# Altium PCB ledcube_v2.PcbDoc (part 5 of 18)
Units mil, origin at the board's own origin, x right, y up, seen from the top; angles counter-clockwise.
Board outline 3130 x 3300 mil, 2 copper layers (Top Layer, Bottom Layer); 188 components, 216 nets, 29515 pads, 250 vias.
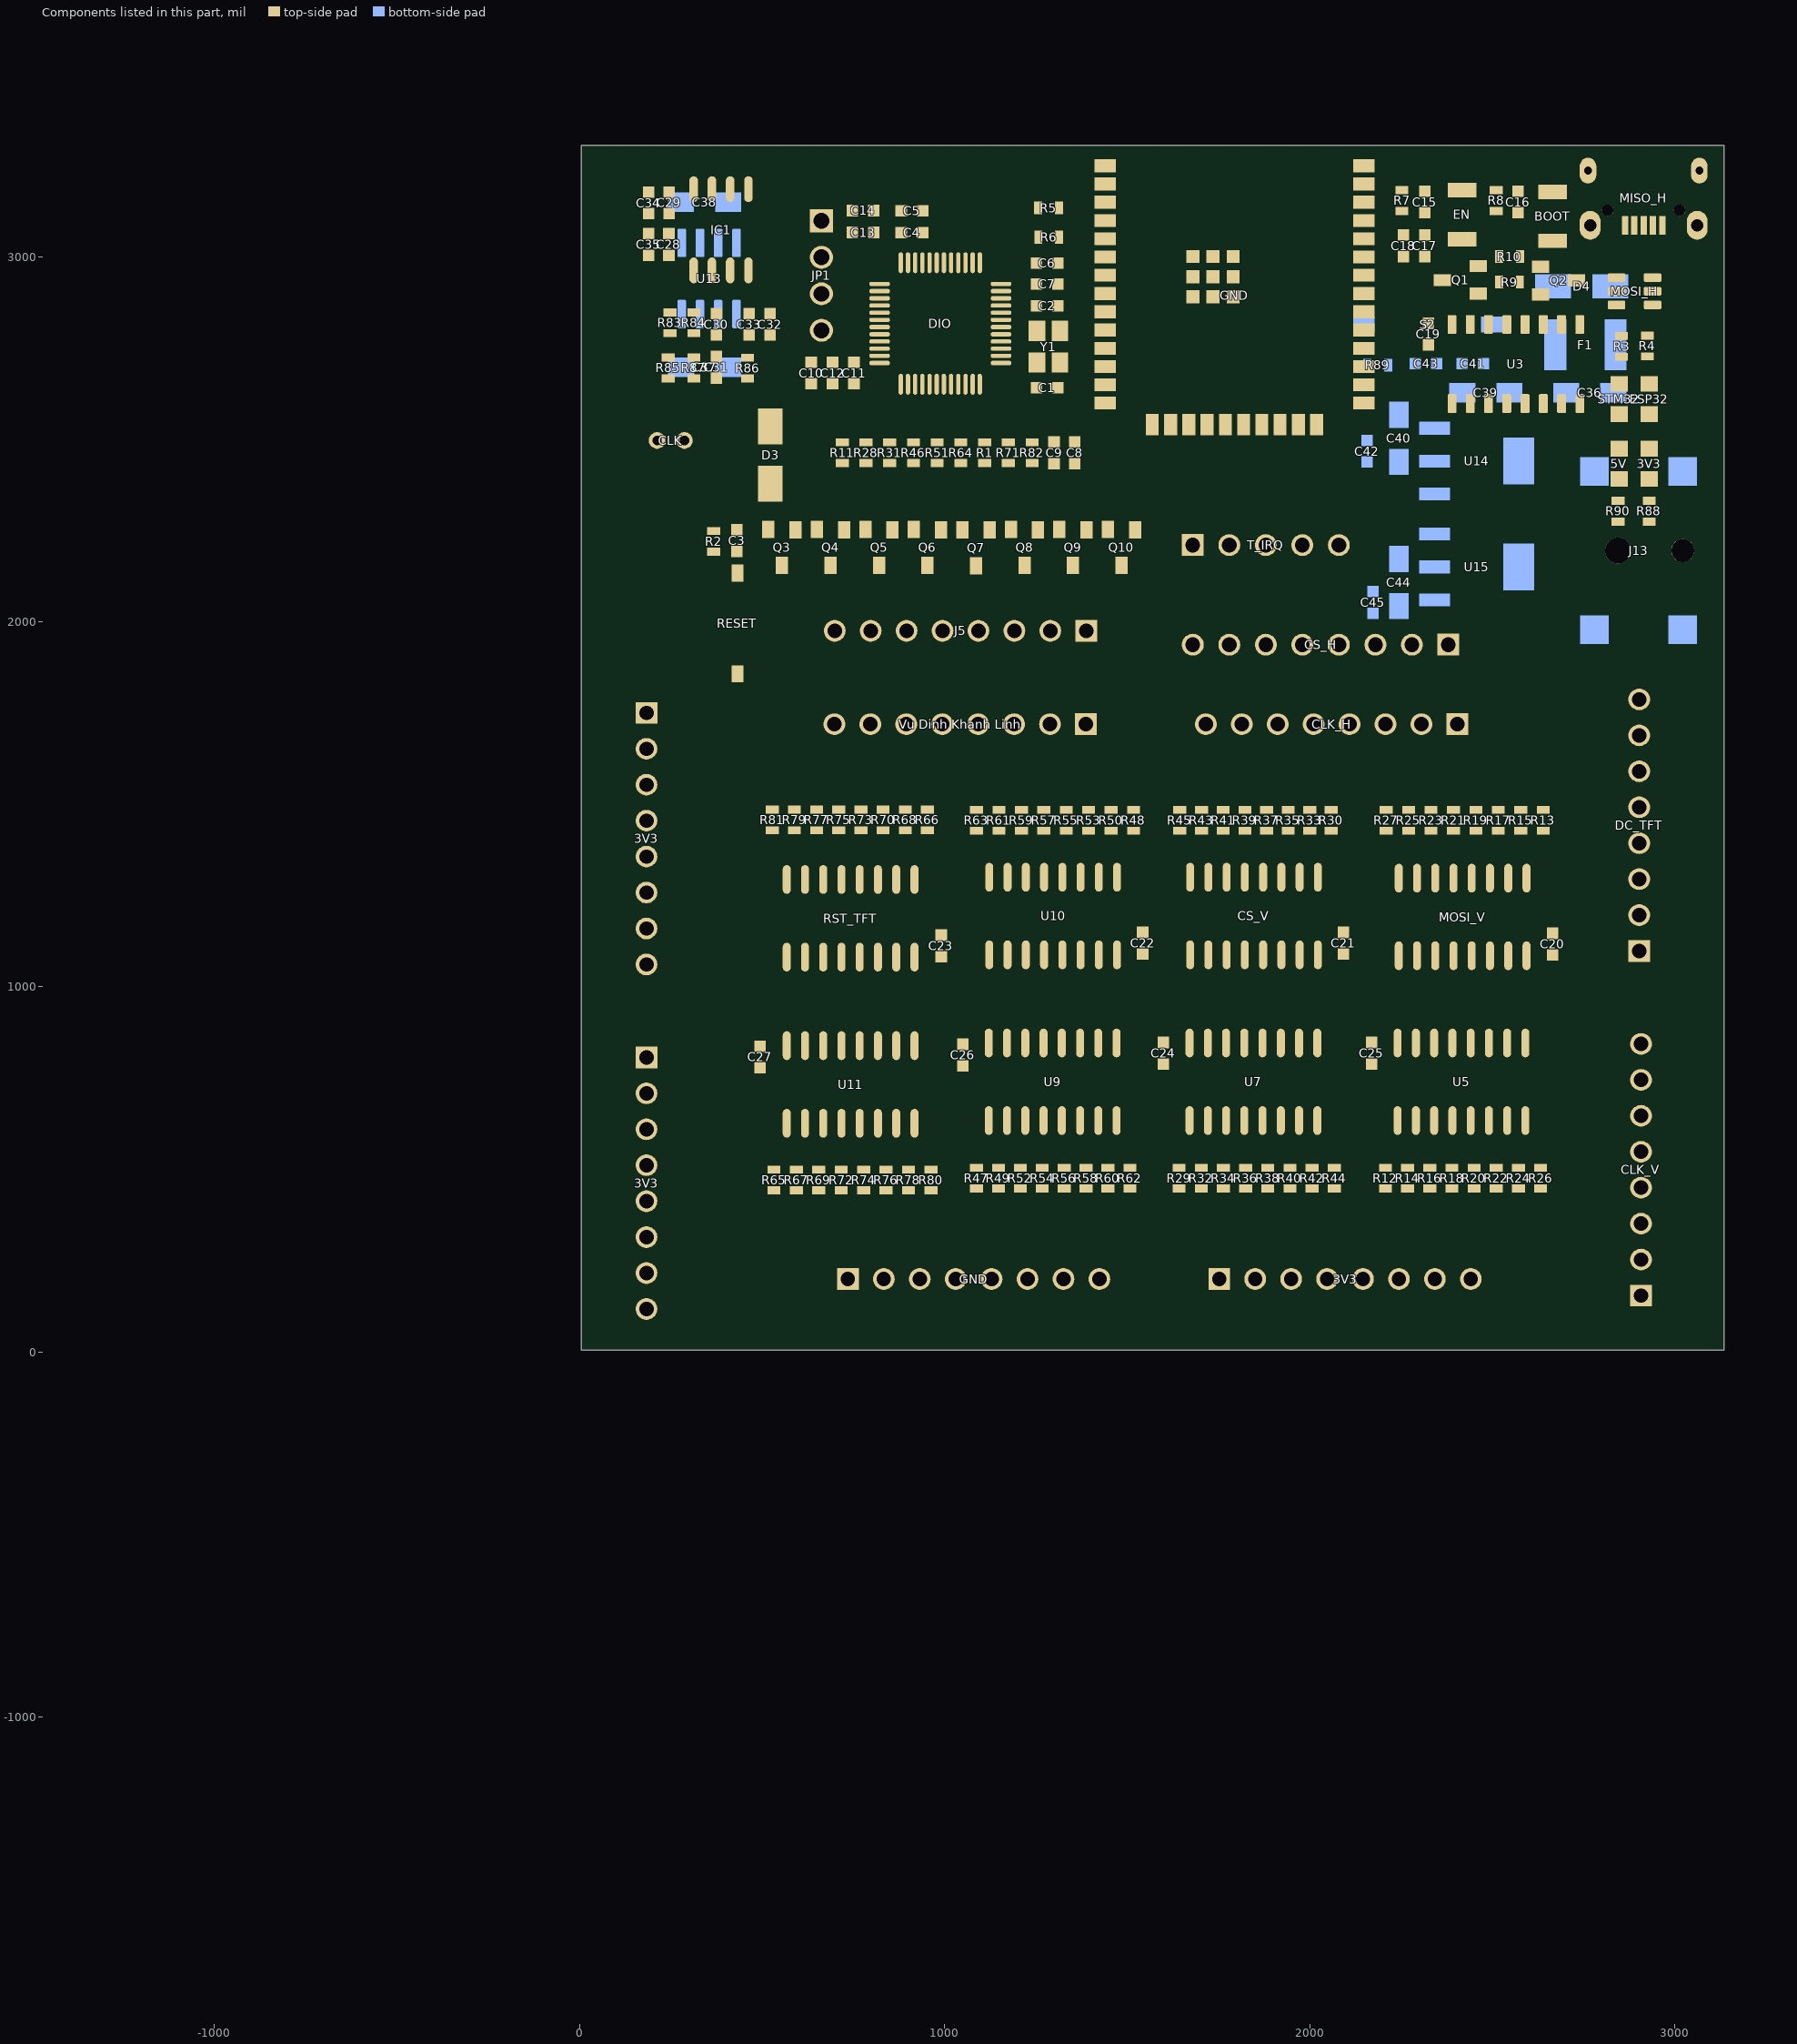
[diagram p4: the components of this part, seen from the top]

## Free pads (board coordinates) (continued)
  round 0 on Mech6: 1(-1373.58,-1738.24) 1(-1373.58,-1738.24) 1(-1373.58,-1737.36) 1(-1373.58,-1737.36) 1(-1373.58,-1737.3) 1(-1373.58,-1737.3) 1(-1373.58,-1736.41) 1(-1373.58,-1736.41) 1(-1373.53,-1735.77) 1(-1373.49,-1735.8) 1(-1373.45,-1735.26) 1(-1373.45,-1735.26) 1(-1373.45,-1735.2) 1(-1373.45,-1735.2) 1(-1373.45,-1735.14) 1(-1373.45,-1735.14) 1(-1373.45,-1735.08) 1(-1373.45,-1735.08) 1(-1373.44,-1737.33) 1(-1373.44,-1736.39) 1(-1373.42,-1735.26) 1(-1373.42,-1735.26) 1(-1373.42,-1735.2) 1(-1373.42,-1735.2) 1(-1373.42,-1735.14) 1(-1373.42,-1735.14) 1(-1373.42,-1735.08) 1(-1373.42,-1735.08) 1(-1373.4,-1735.6) 1(-1373.4,-1735.6) 1(-1373.4,-1735.53) 1(-1373.4,-1735.53) 1(-1373.4,-1735.26) 1(-1373.4,-1735.26) 1(-1373.4,-1735.2) 1(-1373.4,-1735.2) 1(-1373.39,-1735.14) 1(-1373.39,-1735.14) 1(-1373.39,-1735.08) 1(-1373.39,-1735.08) 1(-1373.39,-1735.47) 1(-1373.39,-1735.47) 1(-1373.39,-1735.41) 1(-1373.39,-1735.41) 1(-1373.37,-1735.4) 1(-1373.37,-1735.4) 1(-1373.37,-1735.24) 1(-1373.37,-1735.24) 1(-1373.36,-1735.26) 1(-1373.36,-1735.26) 1(-1373.36,-1735.2) 1(-1373.36,-1735.2) 1(-1373.36,-1735.6) 1(-1373.36,-1735.6) 1(-1373.36,-1735.53) 1(-1373.36,-1735.53) 1(-1373.36,-1735.14) 1(-1373.36,-1735.14) 1(-1373.36,-1735.08) 1(-1373.36,-1735.08) 1(-1373.36,-1735.47) 1(-1373.36,-1735.47) 1(-1373.36,-1735.41) 1(-1373.36,-1735.41) 1(-1373.35,-1738.24) 1(-1373.35,-1738.24) 1(-1373.35,-1737.36) 1(-1373.35,-1737.36) 1(-1373.35,-1737.3) 1(-1373.35,-1737.3) 1(-1373.35,-1736.41) 1(-1373.35,-1736.41) 1(-1373.33,-1735.6) 1(-1373.33,-1735.6) 1(-1373.33,-1735.53) 1(-1373.33,-1735.53) 1(-1373.33,-1735.47) 1(-1373.33,-1735.47) 1(-1373.33,-1735.41) 1(-1373.33,-1735.41) 1(-1373.3,-1735.25) 1(-1373.3,-1735.21) 1(-1373.29,-1735.6) 1(-1373.29,-1735.6) 1(-1373.29,-1735.53) 1(-1373.29,-1735.53) 1(-1373.29,-1735.47) 1(-1373.29,-1735.47) 1(-1373.29,-1735.41) 1(-1373.29,-1735.41) 1(-1373.28,-1736.07) 1(-1373.28,-1736.07) 1(-1373.28,-1736.01) 1(-1373.28,-1736.01) 1(-1373.27,-1735.59) 1(-1373.27,-1735.59) 1(-1373.27,-1735.53) 1(-1373.27,-1735.53) 1(-1373.27,-1735.48) 1(-1373.27,-1735.48) 1(-1373.27,-1735.41) 1(-1373.27,-1735.41) 1(-1373.26,-1735.8) 1(-1373.24,-1736.07) 1(-1373.24,-1736.07) 1(-1373.24,-1736.01) 1(-1373.24,-1736.01) 1(-1373.23,-1735.59) 1(-1373.23,-1735.59) 1(-1373.23,-1735.53) 1(-1373.23,-1735.53) 1(-1373.23,-1735.48) 1(-1373.23,-1735.48) 1(-1373.23,-1735.41) 1(-1373.23,-1735.41) 1(-1373.22,-1735.77) 1(-1373.21,-1736.07) 1(-1373.21,-1736.07) 1(-1373.21,-1736.01) 1(-1373.21,-1736.01) 1(-1373.18,-1735.6) 1(-1373.18,-1735.6) 1(-1373.18,-1735.53) 1(-1373.18,-1735.53) 1(-1373.18,-1736.07) 1(-1373.18,-1736.07) 1(-1373.18,-1736.01) 1(-1373.18,-1736.01) 1(-1373.18,-1735.48) 1(-1373.18,-1735.48) 1(-1373.18,-1735.41) 1(-1373.18,-1735.41) 1(-1373.17,-1735.49) 1(-1373.17,-1735.4) 1(-1373.17,-1735.4) 1(-1373.17,-1735.24) 1(-1373.17,-1735.24) 1(-1373.15,-1735.6) 1(-1373.15,-1735.6) 1(-1373.15,-1735.53) 1(-1373.15,-1735.53) 1(-1373.15,-1737.48) 1(-1373.15,-1737.48) 1(-1373.15,-1737.42) 1(-1373.15,-1737.42) 1(-1373.14,-1735.48) 1(-1373.14,-1735.48) 1(-1373.14,-1735.41) 1(-1373.14,-1735.41) 1(-1373.12,-1735.48) 1(-1373.12,-1735.48) 1(-1373.12,-1735.41) 1(-1373.12,-1735.41) 1(-1373.11,-1736.83) 1(-1373.11,-1736.83) 1(-1373.11,-1736.77) 1(-1373.11,-1736.77) 1(-1373.11,-1737.48) 1(-1373.11,-1737.48) 1(-1373.11,-1737.42) 1(-1373.11,-1737.42) 1(-1373.11,-1737.82) 1(-1373.11,-1737.82) 1(-1373.11,-1737.76) 1(-1373.11,-1737.76) 1(-1373.09,-1735.48) 1(-1373.09,-1735.48) 1(-1373.09,-1735.41) 1(-1373.09,-1735.41) 1(-1373.08,-1736.83) 1(-1373.08,-1736.83) 1(-1373.08,-1736.77) 1(-1373.08,-1736.77) 1(-1373.08,-1737.6) 1(-1373.08,-1737.6) 1(-1373.08,-1737.45) 1(-1373.08,-1737.45) 1(-1373.08,-1737.15) 1(-1373.08,-1737.15) 1(-1373.08,-1737) 1(-1373.08,-1737) 1(-1373.07,-1737.82) 1(-1373.07,-1737.82) 1(-1373.07,-1737.76) 1(-1373.07,-1737.76) 1(-1373.05,-1736.83) 1(-1373.05,-1736.83) 1(-1373.05,-1736.77) 1(-1373.05,-1736.77) 1(-1373.05,-1737.82) 1(-1373.05,-1737.82) 1(-1373.05,-1737.76) 1(-1373.05,-1737.76) 1(-1373.04,-1737.59) 1(-1373.04,-1737.55) 1(-1373.02,-1736.63) 1(-1373.02,-1736.63) 1(-1373.02,-1736.41) 1(-1373.02,-1736.41) 1(-1373.02,-1736.38) 1(-1373.02,-1736.38) 1(-1373.02,-1736.15) 1(-1373.02,-1736.15) 1(-1373.02,-1736.83) 1(-1373.02,-1736.83) 1(-1373.02,-1736.77) 1(-1373.02,-1736.77) 1(-1373.01,-1738.06) 1(-1373.01,-1737.82) 1(-1373.01,-1737.82) 1(-1373.01,-1737.76) 1(-1373.01,-1737.76) 1(-1373.01,-1735.61) 1(-1373.01,-1735.61) 1(-1373.01,-1735.55) 1(-1373.01,-1735.55) 1(-1372.99,-1736.83) 1(-1372.99,-1736.83) 1(-1372.99,-1736.77) 1(-1372.99,-1736.77) 1(-1372.99,-1737.82) 1(-1372.99,-1737.82) 1(-1372.99,-1737.76) 1(-1372.99,-1737.76) 1(-1372.99,-1738.19) 1(-1372.99,-1738.19) 1(-1372.99,-1737.97) 1(-1372.99,-1737.97) 1(-1372.97,-1735.61) 1(-1372.97,-1735.61) 1(-1372.97,-1735.55) 1(-1372.97,-1735.55) 1(-1372.96,-1736.83) 1(-1372.96,-1736.83) 1(-1372.96,-1736.77) 1(-1372.96,-1736.77) 1(-1372.95,-1737.82) 1(-1372.95,-1737.82) 1(-1372.95,-1737.76) 1(-1372.95,-1737.76) 1(-1372.95,-1735.61) 1(-1372.95,-1735.61) 1(-1372.95,-1735.55) 1(-1372.95,-1735.55) 1(-1372.93,-1736.83) 1(-1372.93,-1736.83) 1(-1372.93,-1736.77) 1(-1372.93,-1736.77) 1(-1372.93,-1737.82) 1(-1372.93,-1737.82) 1(-1372.93,-1737.76) 1(-1372.93,-1737.76) 1(-1372.92,-1735.83) 1(-1372.92,-1735.83) 1(-1372.92,-1735.77) 1(-1372.92,-1735.77) 1(-1372.92,-1735.61) 1(-1372.92,-1735.61) 1(-1372.92,-1735.55) 1(-1372.92,-1735.55) 1(-1372.9,-1736.83) 1(-1372.9,-1736.83) 1(-1372.9,-1736.77) 1(-1372.9,-1736.77) 1(-1372.89,-1737.82) 1(-1372.89,-1737.82) 1(-1372.89,-1737.76) 1(-1372.89,-1737.76) 1(-1372.89,-1735.61) 1(-1372.89,-1735.61) 1(-1372.89,-1735.55) 1(-1372.89,-1735.55) 1(-1372.89,-1735.83) 1(-1372.89,-1735.83) 1(-1372.89,-1735.77) 1(-1372.89,-1735.77) 1(-1372.88,-1735.21) 1(-1372.88,-1735.21) 1(-1372.88,-1735.18) 1(-1372.88,-1735.18) 1(-1372.88,-1735.15) 1(-1372.88,-1735.15) 1(-1372.88,-1735.12) 1(-1372.88,-1735.12) 1(-1372.87,-1736.83) 1(-1372.87,-1736.83) 1(-1372.87,-1736.77) 1(-1372.87,-1736.77) 1(-1372.86,-1737.82) 1(-1372.86,-1737.82) 1(-1372.86,-1737.76) 1(-1372.86,-1737.76) 1(-1372.86,-1735.83) 1(-1372.86,-1735.83) 1(-1372.86,-1735.77) 1(-1372.86,-1735.77) 1(-1372.86,-1735.61) 1(-1372.86,-1735.61) 1(-1372.86,-1735.55) 1(-1372.86,-1735.55) 1(-1372.84,-1736.83) 1(-1372.84,-1736.83) 1(-1372.84,-1736.77) 1(-1372.84,-1736.77) 1(-1372.83,-1737.82) 1(-1372.83,-1737.82) 1(-1372.83,-1737.76) 1(-1372.83,-1737.76) 1(-1372.82,-1735.83) 1(-1372.82,-1735.83) 1(-1372.82,-1735.77) 1(-1372.82,-1735.77) 1(-1372.82,-1735.21) 1(-1372.82,-1735.21) 1(-1372.82,-1735.18) 1(-1372.82,-1735.18) 1(-1372.82,-1735.15) 1(-1372.82,-1735.15) 1(-1372.82,-1735.12) 1(-1372.82,-1735.12) 1(-1372.81,-1736.83) 1(-1372.81,-1736.83) 1(-1372.81,-1736.77) 1(-1372.81,-1736.77) 1(-1372.8,-1737.82) 1(-1372.8,-1737.82) 1(-1372.8,-1737.76) 1(-1372.8,-1737.76) 1(-1372.79,-1735.83) 1(-1372.79,-1735.83) 1(-1372.79,-1735.77) 1(-1372.79,-1735.77) 1(-1372.78,-1736.83) 1(-1372.78,-1736.83) 1(-1372.78,-1736.77) 1(-1372.78,-1736.77) 1(-1372.77,-1735.58) 1(-1372.77,-1735.58) 1(-1372.77,-1735.31) 1(-1372.77,-1735.31) 1(-1372.77,-1737.82) 1(-1372.77,-1737.82) 1(-1372.77,-1737.76) 1(-1372.77,-1737.76) 1(-1372.76,-1735.83) 1(-1372.76,-1735.83) 1(-1372.76,-1735.77) 1(-1372.76,-1735.77) 1(-1372.75,-1736.83) 1(-1372.75,-1736.83) 1(-1372.75,-1736.77) 1(-1372.75,-1736.77) 1(-1372.75,-1735.21) 1(-1372.75,-1735.21) 1(-1372.75,-1735.18) 1(-1372.75,-1735.18) 1(-1372.75,-1735.15) 1(-1372.75,-1735.15) 1(-1372.75,-1735.12) 1(-1372.75,-1735.12) 1(-1372.74,-1737.82) 1(-1372.74,-1737.82) 1(-1372.74,-1737.76) 1(-1372.74,-1737.76) 1(-1372.73,-1735.83) 1(-1372.73,-1735.83) 1(-1372.73,-1735.77) 1(-1372.73,-1735.77) 1(-1372.72,-1737.05) 1(-1372.72,-1737.01) 1(-1372.72,-1736.83) 1(-1372.72,-1736.83) 1(-1372.72,-1736.77) 1(-1372.72,-1736.77) 1(-1372.71,-1737.82) 1(-1372.71,-1737.82) 1(-1372.71,-1737.76) 1(-1372.71,-1737.76) 1(-1372.69,-1735.83) 1(-1372.69,-1735.83) 1(-1372.69,-1735.77) 1(-1372.69,-1735.77) 1(-1372.69,-1736.83) 1(-1372.69,-1736.83) 1(-1372.69,-1736.77) 1(-1372.69,-1736.77) 1(-1372.69,-1737.6) 1(-1372.69,-1737.6) 1(-1372.69,-1737.45) 1(-1372.69,-1737.45) 1(-1372.69,-1737.15) 1(-1372.69,-1737.15) 1(-1372.69,-1737) 1(-1372.69,-1737) 1(-1372.68,-1735.21) 1(-1372.68,-1735.21) 1(-1372.68,-1735.18) 1(-1372.68,-1735.18) 1(-1372.68,-1735.15) 1(-1372.68,-1735.15) 1(-1372.68,-1735.12) 1(-1372.68,-1735.12) 1(-1372.68,-1737.82) 1(-1372.68,-1737.82) 1(-1372.68,-1737.76) 1(-1372.68,-1737.76) 1(-1372.66,-1735.83) 1(-1372.66,-1735.83) 1(-1372.66,-1735.77) 1(-1372.66,-1735.77) 1(-1372.65,-1736.83) 1(-1372.65,-1736.83) 1(-1372.65,-1736.77) 1(-1372.65,-1736.77) 1(-1372.65,-1737.18) 1(-1372.65,-1737.18) 1(-1372.65,-1737.12) 1(-1372.65,-1737.12) 1(-1372.64,-1737.82) 1(-1372.64,-1737.82) 1(-1372.64,-1737.76) 1(-1372.64,-1737.76) 1(-1372.63,-1735.83) 1(-1372.63,-1735.83) 1(-1372.63,-1735.77) 1(-1372.63,-1735.77) 1(-1372.62,-1737.18) 1(-1372.62,-1737.18) 1(-1372.62,-1737.12) 1(-1372.62,-1737.12) 1(-1372.6,-1735.83) 1(-1372.6,-1735.83) 1(-1372.6,-1735.77) 1(-1372.6,-1735.77) 1(-1372.59,-1737.48) 1(-1372.59,-1737.48) 1(-1372.59,-1737.42) 1(-1372.59,-1737.42) 1(-1372.56,-1735.83) 1(-1372.56,-1735.83) 1(-1372.56,-1735.77) 1(-1372.56,-1735.77) 1(-1372.56,-1737.48) 1(-1372.56,-1737.48) 1(-1372.56,-1737.42) 1(-1372.56,-1737.42) 1(-1372.56,-1737.82) 1(-1372.56,-1737.82) 1(-1372.56,-1737.75) 1(-1372.56,-1737.75) 1(-1372.56,-1736.84) 1(-1372.56,-1736.84) 1(-1372.56,-1736.77) 1(-1372.56,-1736.77) 1(-1372.55,-1735.55) 1(-1372.53,-1735.83) 1(-1372.53,-1735.83) 1(-1372.53,-1735.77) 1(-1372.53,-1735.77) 1(-1372.52,-1737.6) 1(-1372.52,-1737.6) 1(-1372.52,-1737.44) 1(-1372.52,-1737.44) 1(-1372.52,-1737.14) 1(-1372.52,-1737.14) 1(-1372.52,-1736.99) 1(-1372.52,-1736.99) 1(-1372.52,-1737.82) 1(-1372.52,-1737.82) 1(-1372.52,-1737.75) 1(-1372.52,-1737.75) 1(-1372.52,-1736.84) 1(-1372.52,-1736.84) 1(-1372.52,-1736.77) 1(-1372.52,-1736.77) 1(-1372.51,-1735.55) 1(-1372.5,-1735.58) 1(-1372.5,-1735.58) 1(-1372.5,-1735.31) 1(-1372.5,-1735.31) 1(-1372.5,-1735.83) 1(-1372.5,-1735.83) 1(-1372.5,-1735.77) 1(-1372.5,-1735.77) 1(-1372.5,-1737.82) 1(-1372.5,-1737.82) 1(-1372.5,-1737.75) 1(-1372.5,-1737.75) 1(-1372.49,-1736.84) 1(-1372.49,-1736.84) 1(-1372.49,-1736.77) 1(-1372.49,-1736.77) 1(-1372.49,-1737.58) 1(-1372.49,-1737.54) 1(-1372.47,-1735.83) 1(-1372.47,-1735.83) 1(-1372.47,-1735.77) 1(-1372.47,-1735.77) 1(-1372.46,-1737.82) 1(-1372.46,-1737.82) 1(-1372.46,-1737.75) 1(-1372.46,-1737.75) 1(-1372.46,-1736.84) 1(-1372.46,-1736.84) 1(-1372.46,-1736.77) 1(-1372.46,-1736.77) 1(-1372.44,-1737.82) 1(-1372.44,-1737.82) 1(-1372.44,-1737.75) 1(-1372.44,-1737.75) 1(-1372.43,-1735.83) 1(-1372.43,-1735.83) 1(-1372.43,-1735.77) 1(-1372.43,-1735.77) 1(-1372.43,-1736.84) 1(-1372.43,-1736.84) 1(-1372.43,-1736.77) 1(-1372.43,-1736.77) 1(-1372.4,-1735.83) 1(-1372.4,-1735.83) 1(-1372.4,-1735.77) 1(-1372.4,-1735.77) 1(-1372.4,-1737.82) 1(-1372.4,-1737.82) 1(-1372.4,-1737.75) 1(-1372.4,-1737.75) 1(-1372.4,-1736.84) 1(-1372.4,-1736.84) 1(-1372.4,-1736.77) 1(-1372.4,-1736.77) 1(-1372.39,-1735.57) 1(-1372.39,-1735.57) 1(-1372.39,-1735.44) 1(-1372.39,-1735.44) 1(-1372.38,-1735.63) 1(-1372.38,-1735.63) 1(-1372.38,-1735.6) 1(-1372.38,-1735.6) 1(-1372.38,-1735.41) 1(-1372.38,-1735.41) 1(-1372.38,-1735.38) 1(-1372.38,-1735.38) 1(-1372.38,-1735.35) 1(-1372.38,-1735.35) 1(-1372.38,-1735.32) 1(-1372.38,-1735.32) 1(-1372.38,-1735.29) 1(-1372.38,-1735.29) 1(-1372.38,-1735.26) 1(-1372.38,-1735.26) 1(-1372.38,-1737.82) 1(-1372.38,-1737.82) 1(-1372.38,-1737.75) 1(-1372.38,-1737.75) 1(-1372.37,-1735.14) 1(-1372.37,-1735.14) 1(-1372.37,-1735.11) 1(-1372.37,-1735.11) 1(-1372.37,-1735.22) 1(-1372.37,-1735.22) 1(-1372.37,-1735.19) 1(-1372.37,-1735.19) 1(-1372.37,-1736.84) 1(-1372.37,-1736.84) 1(-1372.37,-1736.77) 1(-1372.37,-1736.77) 1(-1372.37,-1735.83) 1(-1372.37,-1735.83) 1(-1372.37,-1735.77) 1(-1372.37,-1735.77) 1(-1372.34,-1735.83) 1(-1372.34,-1735.83) 1(-1372.34,-1735.77) 1(-1372.34,-1735.77) 1(-1372.34,-1737.82) 1(-1372.34,-1737.82) 1(-1372.34,-1737.75) 1(-1372.34,-1737.75) 1(-1372.34,-1736.84) 1(-1372.34,-1736.84) 1(-1372.34,-1736.77) 1(-1372.34,-1736.77) 1(-1372.32,-1737.82) 1(-1372.32,-1737.82) 1(-1372.32,-1737.75) 1(-1372.32,-1737.75) 1(-1372.31,-1735.63) 1(-1372.31,-1735.63) 1(-1372.31,-1735.6) 1(-1372.31,-1735.6) 1(-1372.31,-1735.41) 1(-1372.31,-1735.41) 1(-1372.31,-1735.38) 1(-1372.31,-1735.38) 1(-1372.31,-1735.35) 1(-1372.31,-1735.35) 1(-1372.31,-1735.32) 1(-1372.31,-1735.32) 1(-1372.31,-1735.29) 1(-1372.31,-1735.29) 1(-1372.31,-1735.26) 1(-1372.31,-1735.26) 1(-1372.31,-1735.83) 1(-1372.31,-1735.83) 1(-1372.31,-1735.77) 1(-1372.31,-1735.77) 1(-1372.31,-1736.84) 1(-1372.31,-1736.84) 1(-1372.31,-1736.77) 1(-1372.31,-1736.77) 1(-1372.31,-1735.14) 1(-1372.31,-1735.14) 1(-1372.31,-1735.11) 1(-1372.31,-1735.11) 1(-1372.31,-1735.22) 1(-1372.31,-1735.22) 1(-1372.31,-1735.19) 1(-1372.31,-1735.19) 1(-1372.29,-1735.57) 1(-1372.29,-1735.57) 1(-1372.29,-1735.44) 1(-1372.29,-1735.44) 1(-1372.28,-1735.83) 1(-1372.28,-1735.83) 1(-1372.28,-1735.77) 1(-1372.28,-1735.77) 1(-1372.28,-1737.82) 1(-1372.28,-1737.82) 1(-1372.28,-1737.75) 1(-1372.28,-1737.75) 1(-1372.27,-1736.84) 1(-1372.27,-1736.84) 1(-1372.27,-1736.77) 1(-1372.27,-1736.77) 1(-1372.26,-1737.82) 1(-1372.26,-1737.82) 1(-1372.26,-1737.75) 1(-1372.26,-1737.75) 1(-1372.25,-1735.83) 1(-1372.25,-1735.83) 1(-1372.25,-1735.77) 1(-1372.25,-1735.77) 1(-1372.25,-1736.84) 1(-1372.25,-1736.84) 1(-1372.25,-1736.77) 1(-1372.25,-1736.77) 1(-1372.22,-1737.82) 1(-1372.22,-1737.82) 1(-1372.22,-1737.75) 1(-1372.22,-1737.75) 1(-1372.21,-1736.84) 1(-1372.21,-1736.84) 1(-1372.21,-1736.77) 1(-1372.21,-1736.77) 1(-1372.2,-1737.82) 1(-1372.2,-1737.82) 1(-1372.2,-1737.75) 1(-1372.2,-1737.75) 1(-1372.19,-1736.84) 1(-1372.19,-1736.84) 1(-1372.19,-1736.77) 1(-1372.19,-1736.77) 1(-1372.17,-1737.04) 1(-1372.17,-1737) 1(-1372.16,-1737.82) 1(-1372.16,-1737.82) 1(-1372.16,-1737.75) 1(-1372.16,-1737.75) 1(-1372.15,-1736.84) 1(-1372.15,-1736.84) 1(-1372.15,-1736.77) 1(-1372.15,-1736.77) 1(-1372.14,-1736.63) 1(-1372.14,-1736.63) 1(-1372.14,-1736.41) 1(-1372.14,-1736.41) 1(-1372.14,-1736.38) 1(-1372.14,-1736.38) 1(-1372.14,-1736.15) 1(-1372.14,-1736.15) 1(-1372.14,-1737.82) 1(-1372.14,-1737.82) 1(-1372.14,-1737.75) 1(-1372.14,-1737.75) 1(-1372.13,-1737.6) 1(-1372.13,-1737.6) 1(-1372.13,-1737.44) 1(-1372.13,-1737.44) 1(-1372.13,-1737.14) 1(-1372.13,-1737.14) 1(-1372.13,-1736.99) 1(-1372.13,-1736.99) 1(-1372.13,-1736.84) 1(-1372.13,-1736.84) 1(-1372.13,-1736.77) 1(-1372.13,-1736.77) 1(-1372.11,-1736.54) 1(-1372.11,-1736.28) 1(-1372.1,-1738.19) 1(-1372.1,-1738.19) 1(-1372.1,-1737.97) 1(-1372.1,-1737.97) 1(-1372.1,-1737.82) 1(-1372.1,-1737.82) 1(-1372.1,-1737.75) 1(-1372.1,-1737.75) 1(-1372.1,-1737.17) 1(-1372.1,-1737.17) 1(-1372.1,-1737.11) 1(-1372.1,-1737.11) 1(-1372.09,-1736.84) 1(-1372.09,-1736.84) 1(-1372.09,-1736.77) 1(-1372.09,-1736.77) 1(-1372.07,-1737.17) 1(-1372.07,-1737.17) 1(-1372.07,-1737.11) 1(-1372.07,-1737.11) 1(-1372.04,-1737.47) 1(-1372.04,-1737.47) 1(-1372.04,-1737.41) 1(-1372.04,-1737.41) 1(-1372.01,-1737.47) 1(-1372.01,-1737.47) 1(-1372.01,-1737.41) 1(-1372.01,-1737.41) 1(-1372.01,-1736.63) 1(-1372.01,-1736.63) 1(-1372.01,-1736.41) 1(-1372.01,-1736.41) 1(-1372,-1736.1) 1(-1372,-1736.1) 1(-1372,-1736) 1(-1372,-1736) 1(-1372,-1737.82) 1(-1372,-1737.82) 1(-1372,-1737.75) 1(-1372,-1737.75) 1(-1372,-1736.84) 1(-1372,-1736.84) 1(-1372,-1736.77) 1(-1372,-1736.77) 1(-1372,-1738.06) 1(-1371.97,-1737.6) 1(-1371.97,-1737.6) 1(-1371.97,-1737.44) 1(-1371.97,-1737.44) 1(-1371.97,-1737.14) 1(-1371.97,-1737.14) 1(-1371.97,-1736.99) 1(-1371.97,-1736.99) 1(-1371.97,-1738.19) 1(-1371.97,-1738.19) 1(-1371.97,-1737.97) 1(-1371.97,-1737.97) 1(-1371.96,-1737.82) 1(-1371.96,-1737.82) 1(-1371.96,-1737.75) 1(-1371.96,-1737.75) 1(-1371.96,-1736.84) 1(-1371.96,-1736.84) 1(-1371.96,-1736.77) 1(-1371.96,-1736.77) 1(-1371.94,-1737.82) 1(-1371.94,-1737.82) 1(-1371.94,-1737.75) 1(-1371.94,-1737.75) 1(-1371.94,-1736.84) 1(-1371.94,-1736.84) 1(-1371.94,-1736.77) 1(-1371.94,-1736.77) 1(-1371.94,-1737.58) 1(-1371.94,-1737.54) 1(-1371.9,-1737.82) 1(-1371.9,-1737.82) 1(-1371.9,-1737.75) 1(-1371.9,-1737.75) 1(-1371.9,-1736.84) 1(-1371.9,-1736.84) 1(-1371.9,-1736.77) 1(-1371.9,-1736.77) 1(-1371.88,-1736.84) 1(-1371.88,-1736.84) 1(-1371.88,-1736.77) 1(-1371.88,-1736.77) 1(-1371.88,-1737.82) 1(-1371.88,-1737.82) 1(-1371.88,-1737.75) 1(-1371.88,-1737.75) 1(-1371.84,-1736.84) 1(-1371.84,-1736.84) 1(-1371.84,-1736.77) 1(-1371.84,-1736.77) 1(-1371.84,-1737.82) 1(-1371.84,-1737.82) 1(-1371.84,-1737.75) 1(-1371.84,-1737.75) 1(-1371.82,-1736.84) 1(-1371.82,-1736.84) 1(-1371.82,-1736.77) 1(-1371.82,-1736.77) 1(-1371.82,-1737.82) 1(-1371.82,-1737.82) 1(-1371.82,-1737.75) 1(-1371.82,-1737.75) 1(-1371.78,-1736.84) 1(-1371.78,-1736.84) 1(-1371.78,-1736.77) 1(-1371.78,-1736.77) 1(-1371.78,-1737.82) 1(-1371.78,-1737.82) 1(-1371.78,-1737.75) 1(-1371.78,-1737.75) 1(-1371.76,-1736.84) 1(-1371.76,-1736.84) 1(-1371.76,-1736.77) 1(-1371.76,-1736.77) 1(-1371.76,-1737.82) 1(-1371.76,-1737.82) 1(-1371.76,-1737.75) 1(-1371.76,-1737.75) 1(-1371.73,-1736.84) 1(-1371.73,-1736.84) 1(-1371.73,-1736.77) 1(-1371.73,-1736.77) 1(-1371.72,-1737.82) 1(-1371.72,-1737.82) 1(-1371.72,-1737.75) 1(-1371.72,-1737.75) 1(-1371.7,-1736.84) 1(-1371.7,-1736.84) 1(-1371.7,-1736.77) 1(-1371.7,-1736.77) 1(-1371.7,-1737.82) 1(-1371.7,-1737.82) 1(-1371.7,-1737.75) 1(-1371.7,-1737.75) 1(-1371.67,-1736.84) 1(-1371.67,-1736.84) 1(-1371.67,-1736.77) 1(-1371.67,-1736.77) 1(-1371.66,-1737.82) 1(-1371.66,-1737.82) 1(-1371.66,-1737.75) 1(-1371.66,-1737.75) 1(-1371.64,-1736.84) 1(-1371.64,-1736.84) 1(-1371.64,-1736.77) 1(-1371.64,-1736.77) 1(-1371.64,-1737.82) 1(-1371.64,-1737.82) 1(-1371.64,-1737.75) 1(-1371.64,-1737.75) 1(-1371.62,-1737.04) 1(-1371.62,-1737) 1(-1371.61,-1736.84) 1(-1371.61,-1736.84) 1(-1371.61,-1736.77) 1(-1371.61,-1736.77) 1(-1371.6,-1737.82) 1(-1371.6,-1737.82) 1(-1371.6,-1737.75) 1(-1371.6,-1737.75) 1(-1371.58,-1737.6) 1(-1371.58,-1737.6) 1(-1371.58,-1737.44) 1(-1371.58,-1737.44) 1(-1371.58,-1736.84) 1(-1371.58,-1736.84) 1(-1371.58,-1736.77) 1(-1371.58,-1736.77) 1(-1371.58,-1737.14) 1(-1371.58,-1737.14) 1(-1371.58,-1736.99) 1(-1371.58,-1736.99) 1(-1371.58,-1737.82) 1(-1371.58,-1737.82) 1(-1371.58,-1737.75) 1(-1371.58,-1737.75) 1(-1371.55,-1736.84) 1(-1371.55,-1736.84) 1(-1371.55,-1736.77) 1(-1371.55,-1736.77) 1(-1371.55,-1737.17) 1(-1371.55,-1737.17) 1(-1371.55,-1737.11) 1(-1371.55,-1737.11) 1(-1371.54,-1737.82) 1(-1371.54,-1737.82) 1(-1371.54,-1737.75) 1(-1371.54,-1737.75) 1(-1371.52,-1737.17) 1(-1371.52,-1737.17) 1(-1371.52,-1737.11) 1(-1371.52,-1737.11) 1(-1371.49,-1736.1) 1(-1371.49,-1736.1) 1(-1371.49,-1736) 1(-1371.49,-1736) 1(-1371.48,-1735.82) 1(-1371.48,-1735.82) 1(-1371.48,-1735.76) 1(-1371.48,-1735.76) 1(-1371.47,-1737.47) 1(-1371.47,-1737.47) 1(-1371.47,-1737.41) 1(-1371.47,-1737.41) 1(-1371.47,-1735.58) 1(-1371.47,-1735.58) 1(-1371.47,-1735.54) 1(-1371.47,-1735.54) 1(-1371.47,-1736.24) 1(-1371.47,-1736.24) 1(-1371.47,-1736.18) 1(-1371.47,-1736.18) 1(-1371.45,-1735.82) 1(-1371.45,-1735.82) 1(-1371.45,-1735.76) 1(-1371.45,-1735.76) 1(-1371.44,-1737.47) 1(-1371.44,-1737.47) 1(-1371.44,-1737.41) 1(-1371.44,-1737.41) 1(-1371.44,-1736.24) 1(-1371.44,-1736.24) 1(-1371.44,-1736.18) 1(-1371.44,-1736.18) 1(-1371.44,-1737.82) 1(-1371.44,-1737.82) 1(-1371.44,-1737.75) 1(-1371.44,-1737.75) 1(-1371.43,-1736.84) 1(-1371.43,-1736.84) 1(-1371.43,-1736.77) 1(-1371.43,-1736.77) 1(-1371.41,-1735.58) 1(-1371.41,-1735.58) 1(-1371.41,-1735.54) 1(-1371.41,-1735.54) 1(-1371.4,-1737.6) 1(-1371.4,-1737.6) 1(-1371.4,-1737.44) 1(-1371.4,-1737.44) 1(-1371.4,-1737.15) 1(-1371.4,-1737.15) 1(-1371.4,-1736.99) 1(-1371.4,-1736.99) 1(-1371.4,-1737.82) 1(-1371.4,-1737.82) 1(-1371.4,-1737.75) 1(-1371.4,-1737.75) 1(-1371.4,-1736.84) 1(-1371.4,-1736.84) 1(-1371.4,-1736.77) 1(-1371.4,-1736.77) 1(-1371.39,-1735.14) 1(-1371.39,-1735.14) 1(-1371.39,-1735.08) 1(-1371.39,-1735.08) 1(-1371.38,-1735.26) 1(-1371.38,-1735.26) 1(-1371.38,-1735.2) 1(-1371.38,-1735.2) 1(-1371.37,-1737.82) 1(-1371.37,-1737.82) 1(-1371.37,-1737.75) 1(-1371.37,-1737.75) 1(-1371.37,-1736.84) 1(-1371.37,-1736.84) 1(-1371.37,-1736.77) 1(-1371.37,-1736.77) 1(-1371.37,-1737.58) 1(-1371.37,-1737.54) 1(-1371.35,-1735.14) 1(-1371.35,-1735.14) 1(-1371.35,-1735.08) 1(-1371.35,-1735.08) 1(-1371.35,-1735.26) 1(-1371.35,-1735.26) 1(-1371.35,-1735.2) 1(-1371.35,-1735.2) 1(-1371.34,-1737.82) 1(-1371.34,-1737.82) 1(-1371.34,-1737.75) 1(-1371.34,-1737.75) 1(-1371.34,-1735.57) 1(-1371.34,-1735.57) 1(-1371.34,-1735.54) 1(-1371.34,-1735.54) 1(-1371.34,-1736.84) 1(-1371.34,-1736.84) 1(-1371.34,-1736.77) 1(-1371.34,-1736.77) 1(-1371.33,-1735.26) 1(-1371.33,-1735.26) 1(-1371.33,-1735.2) 1(-1371.33,-1735.2) 1(-1371.33,-1735.14) 1(-1371.33,-1735.14) 1(-1371.33,-1735.08) 1(-1371.33,-1735.08) 1(-1371.32,-1735.5) 1(-1371.32,-1735.5) 1(-1371.32,-1735.44) 1(-1371.32,-1735.44) 1(-1371.31,-1737.82) 1(-1371.31,-1737.82) 1(-1371.31,-1737.75) 1(-1371.31,-1737.75) 1(-1371.31,-1736.84) 1(-1371.31,-1736.84) 1(-1371.31,-1736.77) 1(-1371.31,-1736.77) 1(-1371.29,-1735.26) 1(-1371.29,-1735.26) 1(-1371.29,-1735.2) 1(-1371.29,-1735.2) 1(-1371.29,-1735.14) 1(-1371.29,-1735.14) 1(-1371.29,-1735.08) 1(-1371.29,-1735.08) 1(-1371.29,-1735.67) 1(-1371.29,-1735.66) 1(-1371.28,-1735.5) 1(-1371.28,-1735.5) 1(-1371.28,-1735.44) 1(-1371.28,-1735.44) 1(-1371.28,-1737.82) 1(-1371.28,-1737.82) 1(-1371.28,-1737.75) 1(-1371.28,-1737.75) 1(-1371.27,-1735.57) 1(-1371.27,-1735.57) 1(-1371.27,-1735.54) 1(-1371.27,-1735.54) 1(-1371.27,-1736.84) 1(-1371.27,-1736.84) 1(-1371.27,-1736.77) 1(-1371.27,-1736.77) 1(-1371.26,-1735.63) 1(-1371.26,-1735.63) 1(-1371.26,-1735.48) 1(-1371.26,-1735.48) 1(-1371.26,-1735.2) 1(-1371.26,-1735.2) 1(-1371.26,-1735.09) 1(-1371.26,-1735.09) 1(-1371.25,-1737.82) 1(-1371.25,-1737.82) 1(-1371.25,-1737.75) 1(-1371.25,-1737.75) 1(-1371.25,-1736.84) 1(-1371.25,-1736.84) 1(-1371.25,-1736.77) 1(-1371.25,-1736.77) 1(-1371.24,-1736.24) 1(-1371.24,-1736.24) 1(-1371.24,-1735.98) 1(-1371.24,-1735.98) 1(-1371.24,-1735.95) 1(-1371.24,-1735.95) 1(-1371.24,-1735.69) 1(-1371.24,-1735.69) 1(-1371.22,-1737.82) 1(-1371.22,-1737.82) 1(-1371.22,-1737.75) 1(-1371.22,-1737.75) 1(-1371.21,-1736.84) 1(-1371.21,-1736.84) 1(-1371.21,-1736.77) 1(-1371.21,-1736.77) 1(-1371.21,-1735.57) 1(-1371.21,-1735.57) 1(-1371.21,-1735.54) 1(-1371.21,-1735.54) 1(-1371.19,-1737.82) 1(-1371.19,-1737.82) 1(-1371.19,-1737.75) 1(-1371.19,-1737.75) 1(-1371.19,-1736.84) 1(-1371.19,-1736.84) 1(-1371.19,-1736.77) 1(-1371.19,-1736.77) 1(-1371.16,-1735.2) 1(-1371.16,-1735.2) 1(-1371.16,-1735.09) 1(-1371.16,-1735.09) 1(-1371.16,-1737.82) 1(-1371.16,-1737.82) 1(-1371.16,-1737.75) 1(-1371.16,-1737.75) 1(-1371.15,-1736.84) 1(-1371.15,-1736.84) 1(-1371.15,-1736.77) 1(-1371.15,-1736.77) 1(-1371.15,-1735.57) 1(-1371.15,-1735.57) 1(-1371.15,-1735.54) 1(-1371.15,-1735.54) 1(-1371.13,-1737.82) 1(-1371.13,-1737.82) 1(-1371.13,-1737.75) 1(-1371.13,-1737.75) 1(-1371.13,-1735.14) 1(-1371.13,-1735.14) 1(-1371.13,-1735.08) 1(-1371.13,-1735.08) 1(-1371.13,-1736.84) 1(-1371.13,-1736.84) 1(-1371.13,-1736.77) 1(-1371.13,-1736.77) 1(-1371.12,-1736.63) 1(-1371.12,-1736.63) 1(-1371.12,-1736.41) 1(-1371.12,-1736.41) 1(-1371.11,-1735.35) 1(-1371.11,-1735.35) 1(-1371.11,-1735.31) 1(-1371.11,-1735.31) 1(-1371.11,-1735.28) 1(-1371.11,-1735.28) 1(-1371.11,-1735.24) 1(-1371.11,-1735.24) 1(-1371.1,-1736.54) 1(-1371.1,-1737.82) 1(-1371.1,-1737.82) 1(-1371.1,-1737.75) 1(-1371.1,-1737.75) 1(-1371.1,-1735.14) 1(-1371.1,-1735.14) 1(-1371.1,-1735.08) 1(-1371.1,-1735.08) 1(-1371.09,-1736.24) 1(-1371.09,-1736.24) 1(-1371.09,-1735.98) 1(-1371.09,-1735.98) 1(-1371.09,-1735.95) 1(-1371.09,-1735.95) 1(-1371.09,-1735.69) 1(-1371.09,-1735.69) 1(-1371.09,-1736.84) 1(-1371.09,-1736.84) 1(-1371.09,-1736.77) 1(-1371.09,-1736.77) 1(-1371.09,-1738.19) 1(-1371.09,-1738.19) 1(-1371.09,-1737.97) 1(-1371.09,-1737.97) 1(-1371.07,-1735.45) 1(-1371.07,-1737.82) 1(-1371.07,-1737.82) 1(-1371.07,-1737.75) 1(-1371.07,-1737.75) 1(-1371.07,-1735.14) 1(-1371.07,-1735.14) 1(-1371.07,-1735.08) 1(-1371.07,-1735.08) 1(-1371.07,-1735.45) 1(-1371.06,-1736.84) 1(-1371.06,-1736.84) 1(-1371.06,-1736.77) 1(-1371.06,-1736.77) 1(-1371.05,-1737.05) 1(-1371.05,-1737.01) 1(-1371.05,-1735.35) 1(-1371.05,-1735.35) 1(-1371.05,-1735.31) 1(-1371.05,-1735.31) 1(-1371.05,-1735.28) 1(-1371.05,-1735.28) 1(-1371.05,-1735.24) 1(-1371.05,-1735.24) 1(-1371.04,-1735.14) 1(-1371.04,-1735.14) 1(-1371.04,-1735.08) 1(-1371.04,-1735.08) 1(-1371.04,-1737.82) 1(-1371.04,-1737.82) 1(-1371.04,-1737.75) 1(-1371.04,-1737.75) 1(-1371.03,-1736.84) 1(-1371.03,-1736.84) 1(-1371.03,-1736.77) 1(-1371.03,-1736.77) 1(-1371.01,-1737.6) 1(-1371.01,-1737.6) 1(-1371.01,-1737.44) 1(-1371.01,-1737.44) 1(-1371.01,-1737.15) 1(-1371.01,-1737.15) 1(-1371.01,-1736.99) 1(-1371.01,-1736.99) 1(-1371.01,-1737.82) 1(-1371.01,-1737.82) 1(-1371.01,-1737.75) 1(-1371.01,-1737.75) 1(-1371.01,-1735.21) 1(-1371.01,-1735.21) 1(-1371.01,-1735.09) 1(-1371.01,-1735.09) 1(-1371,-1736.84) 1(-1371,-1736.84) 1(-1371,-1736.77) 1(-1371,-1736.77) 1(-1370.97,-1737.17) 1(-1370.97,-1737.17) 1(-1370.97,-1737.11) 1(-1370.97,-1737.11) 1(-1370.97,-1737.82) 1(-1370.97,-1737.82) 1(-1370.97,-1737.75) 1(-1370.97,-1737.75) 1(-1370.97,-1736.84) 1(-1370.97,-1736.84) 1(-1370.97,-1736.77) 1(-1370.97,-1736.77) 1(-1370.94,-1737.17) 1(-1370.94,-1737.17) 1(-1370.94,-1737.11) 1(-1370.94,-1737.11) 1(-1370.91,-1735.21) 1(-1370.91,-1735.21) 1(-1370.91,-1735.09) 1(-1370.91,-1735.09) 1(-1370.87,-1735.19) 1(-1370.87,-1735.19) 1(-1370.87,-1734.98) 1(-1370.87,-1734.98) 1(-1370.86,-1735.63) 1(-1370.86,-1735.63) 1(-1370.86,-1735.48) 1(-1370.86,-1735.48) 1(-1370.86,-1734.98) 1(-1370.86,-1734.98) 1(-1370.86,-1734.93) 1(-1370.86,-1734.93) 1(-1370.84,-1735.32) 1(-1370.83,-1735.32) 1(-1370.81,-1737.26) 1(-1370.81,-1737.26) 1(-1370.81,-1736.38) 1(-1370.81,-1736.38) 1(-1370.81,-1738.2) 1(-1370.81,-1738.2) 1(-1370.81,-1737.32) 1(-1370.81,-1737.32) 1(-1370.8,-1735.99) 1(-1370.8,-1735.99) 1(-1370.8,-1735.93) 1(-1370.8,-1735.93) 1(-1370.79,-1735.54) 1(-1370.79,-1735.54) 1(-1370.79,-1735.47) 1(-1370.79,-1735.47) 1(-1370.76,-1735.99) 1(-1370.76,-1735.99) 1(-1370.76,-1735.93) 1(-1370.76,-1735.93) 1(-1370.75,-1735.54) 1(-1370.75,-1735.54) 1(-1370.75,-1735.47) 1(-1370.75,-1735.47) 1(-1370.72,-1737.29) 1(-1370.72,-1735.54) 1(-1370.72,-1735.54) 1(-1370.72,-1735.47) 1(-1370.72,-1735.47) 1(-1370.72,-1738.23) 1(-1370.71,-1735.99) 1(-1370.71,-1735.99) 1(-1370.71,-1735.93) 1(-1370.71,-1735.93) 1(-1370.68,-1735.54) 1(-1370.68,-1735.54) 1(-1370.68,-1735.47) 1(-1370.68,-1735.47) 1(-1370.68,-1735.99) 1(-1370.68,-1735.99) 1(-1370.68,-1735.93) 1(-1370.68,-1735.93) 1(-1370.59,-1737.26) 1(-1370.59,-1737.26) 1(-1370.59,-1736.38) 1(-1370.59,-1736.38) 1(-1370.58,-1738.2) 1(-1370.58,-1738.2) 1(-1370.58,-1737.32) 1(-1370.58,-1737.32) 1(-1370.56,-1734.98) 1(-1370.56,-1734.98) 1(-1370.56,-1734.93) 1(-1370.56,-1734.93) 1(-1370.55,-1735.19) 1(-1370.55,-1735.19) 1(-1370.55,-1734.98) 1(-1370.55,-1734.98)